# Altium PCB LORA_V1.0.PcbDoc
Units mm, origin at the board's own origin, x right, y up, seen from the top; angles counter-clockwise.
Board outline 52.83 x 35.94 mm, 2 copper layers (Top Layer, Bottom Layer); 20 components, 16 nets, 89 pads, 12 vias.
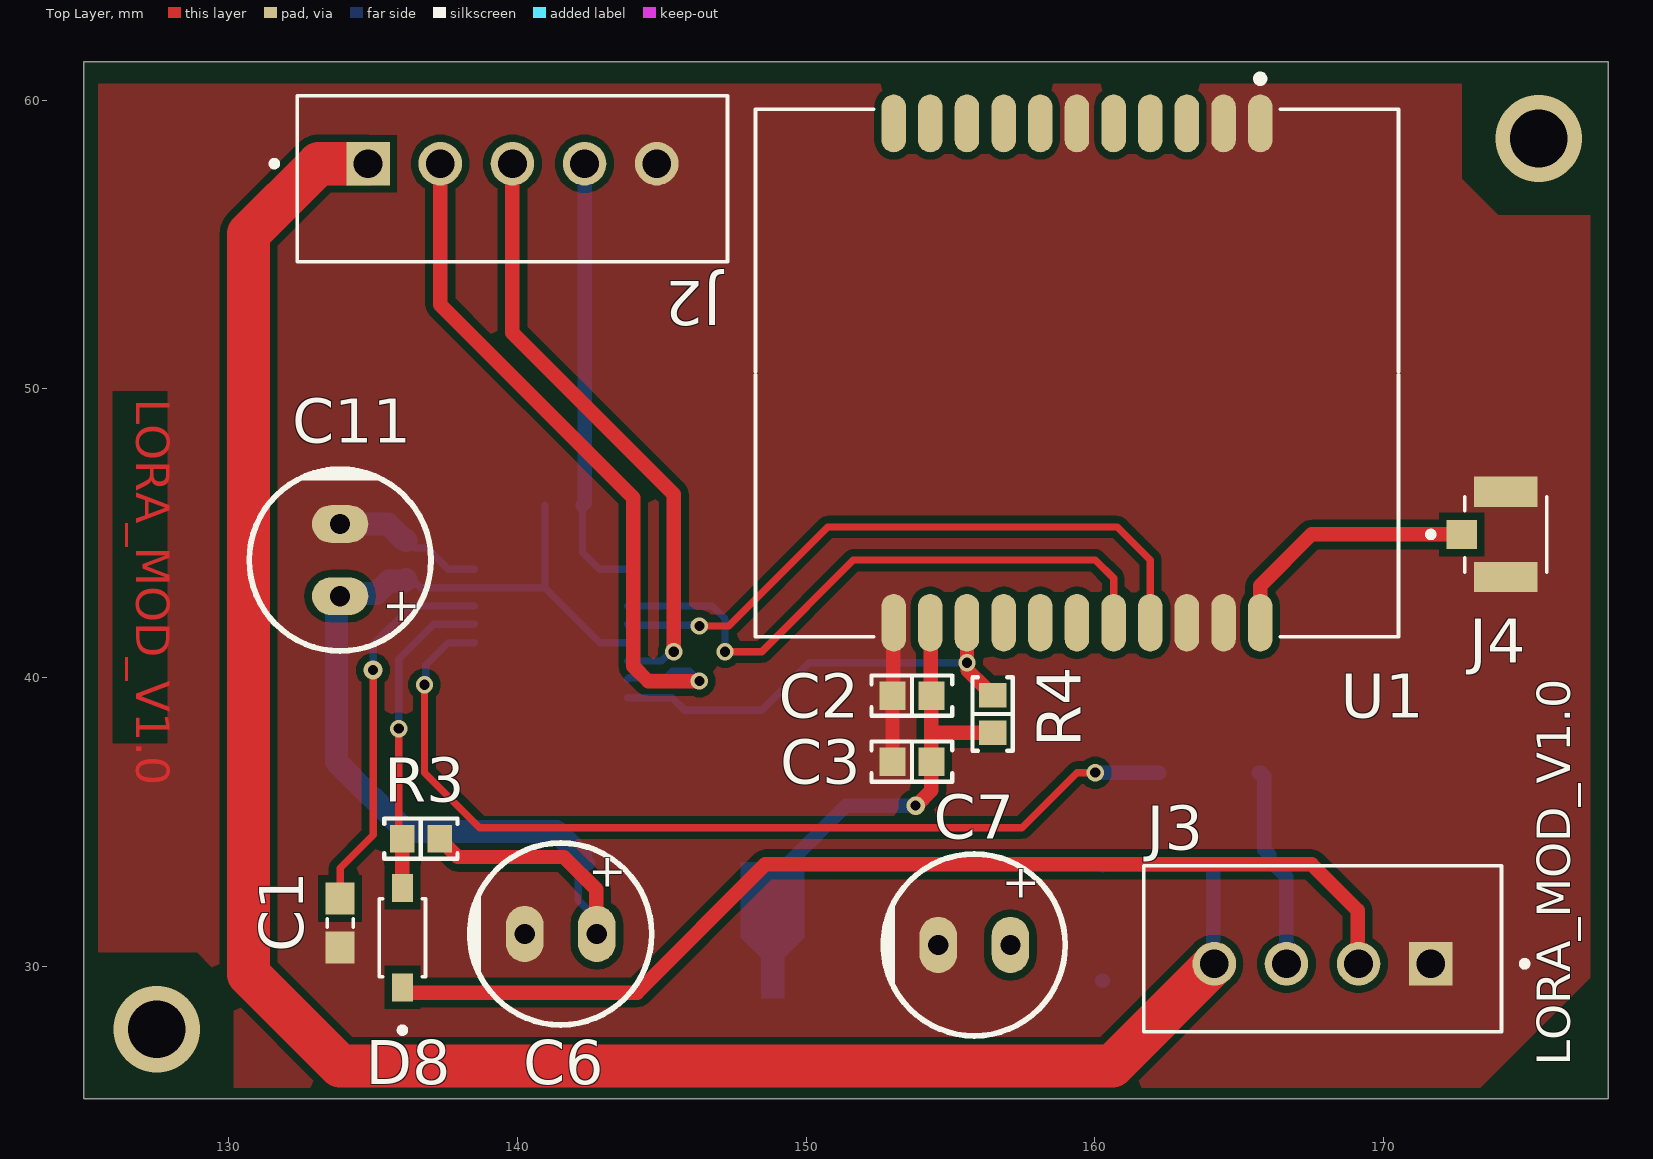
[diagram p0: Top Layer view]
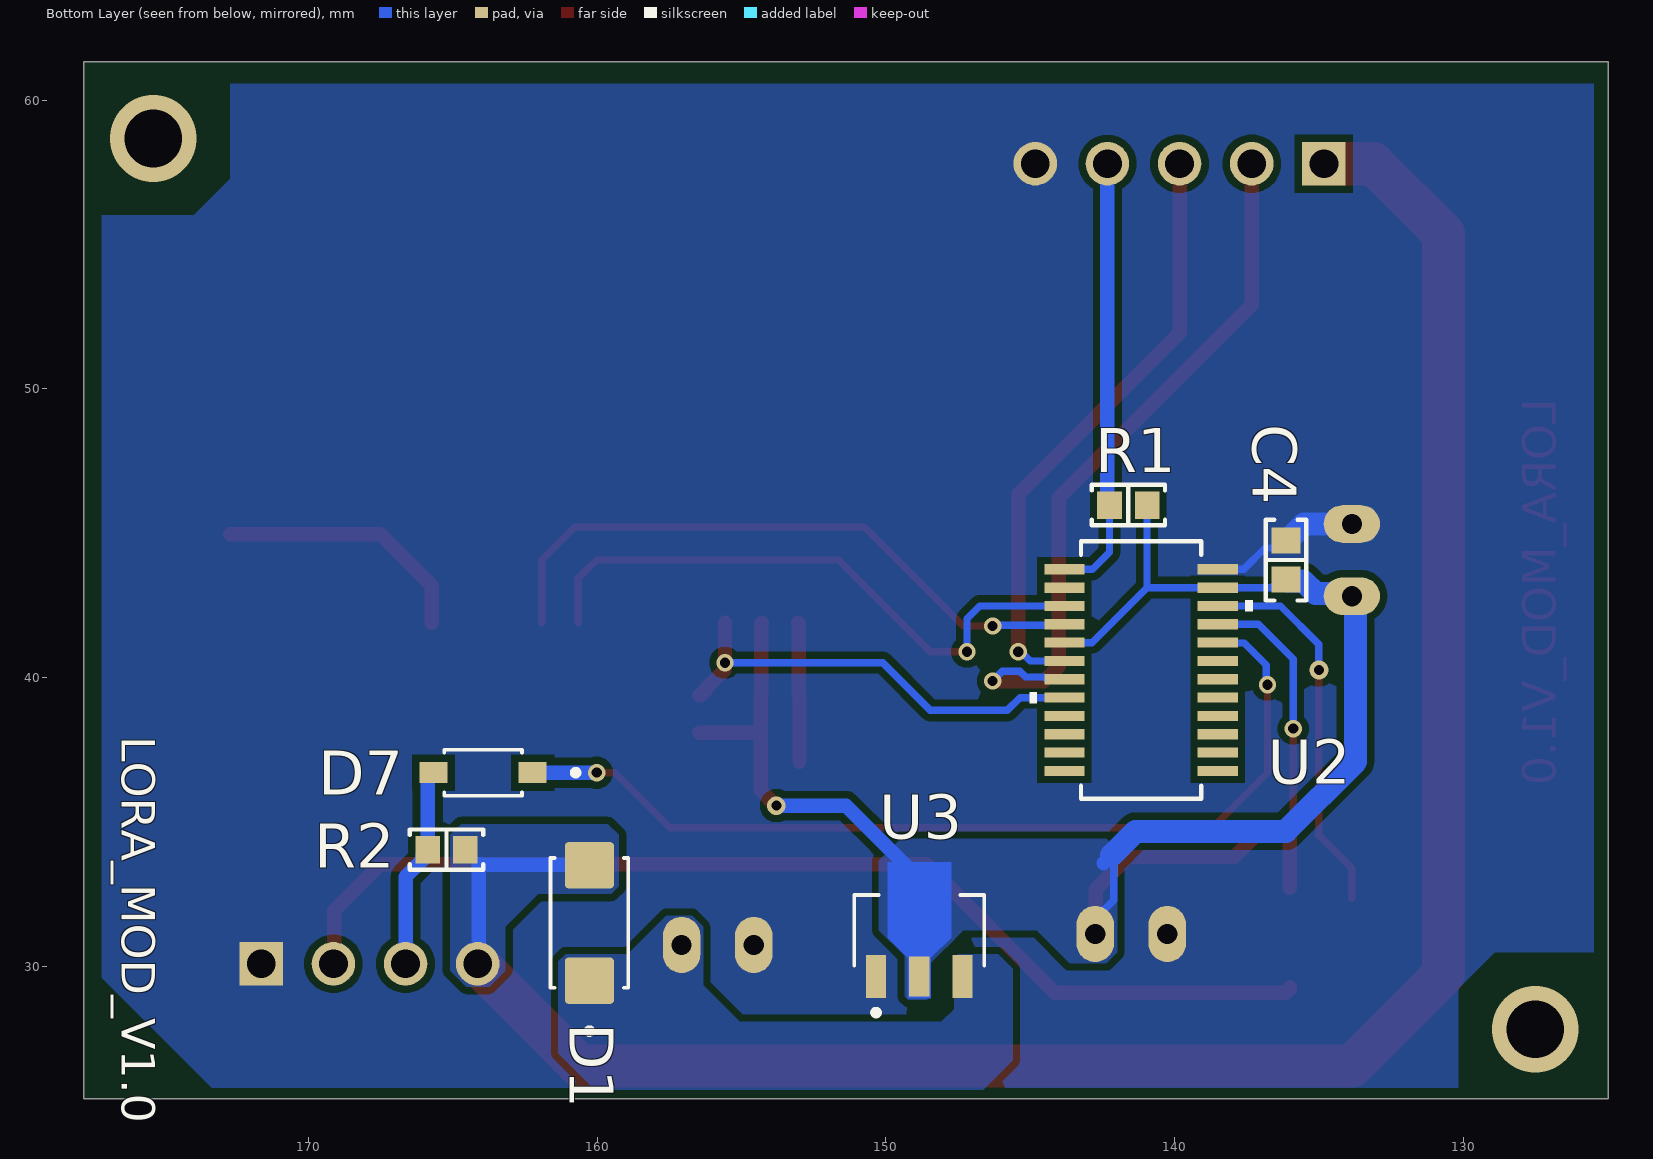
[diagram p1: Bottom Layer view, seen from below]
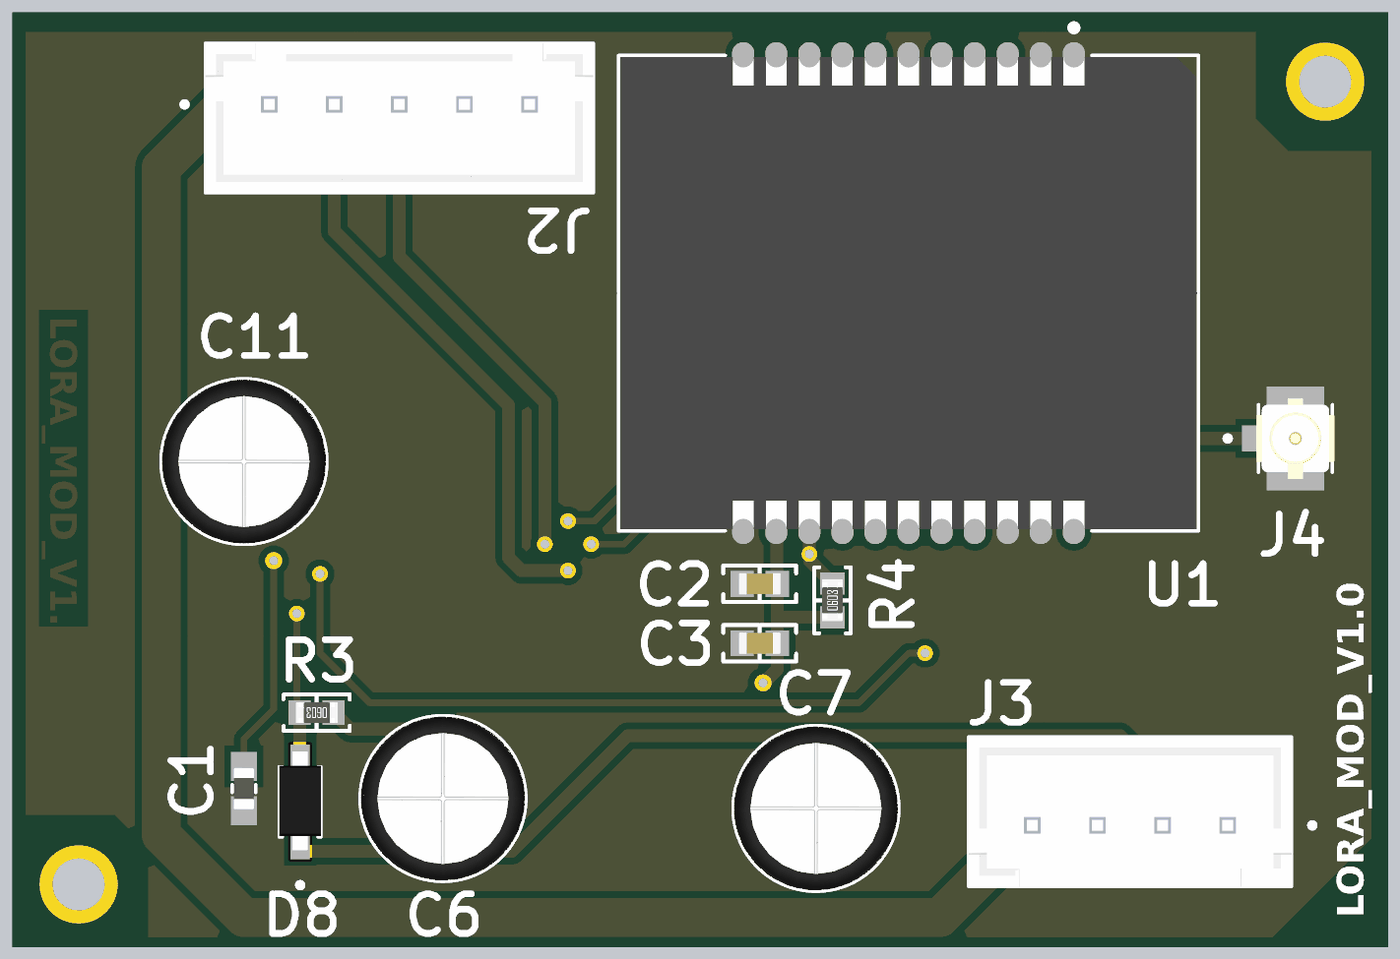
[diagram p2: 3D render of the assembled board from above, using the file's embedded part models]
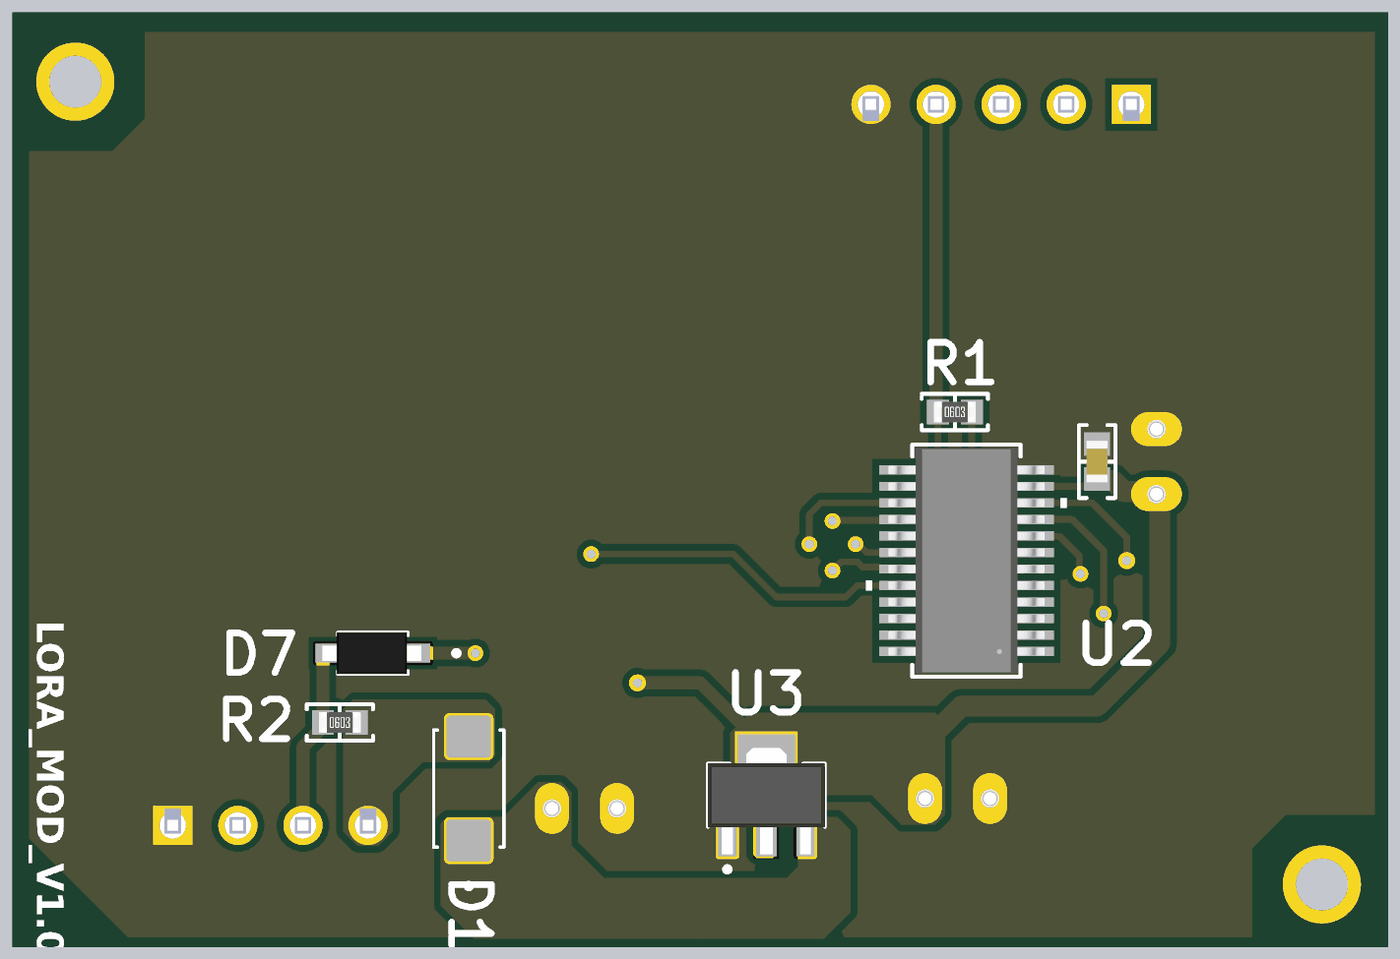
[diagram p3: 3D render of the assembled board from below, using the file's embedded part models]

## Layer stack, top to bottom
Top Solder: solder mask 0.0102, Solder Resist, Dk 3.5
Top Layer: signal copper 0.0356
Dielectric 1: dielectric 0.32, FR-4, Dk 4.8
Bottom Layer: signal copper 0.0356
Bottom Solder: solder mask 0.0102, Solder Resist, Dk 3.5

## Board outline
124.968,25.4 124.968,61.341 177.8,61.341 177.8,25.4

## Design rules (kind name [scope] priority, off if disabled: settings)
Clearance [All] p1: gap=0.254 ignorepadtopadclearanceinfootprint=FALSE
PolygonConnect [All] p1: connectstyle=Direct reliefconductorwidth=0.254 reliefentries=4 polygonreliefangle="90 Angle" airgapwidth=0.254
RoutingVias [All] p1: holewidth=0.35 width=0.65 viastyle="Through Hole" minholewidth=0.35 minwidth=0.6 maxholewidth=0.35 maxwidth=0.6
SolderMaskExpansion [All] p1: expansion=0 istentingtop=FALSE
SupplyNets "Schematic Supply Nets" [InNet('GND')] p1: voltage=0.000
Width [All] p1: maxlimit=1.5 minlimit=0.254 preferedwidth=0.5 bottomlayer_maxwidth=0.8 minimp=50.000000 maximp=50.000000 favimp=50.000000
30 further rules are at their usual default settings.

## Components (designator, comment, footprint, x,y, rotation, side; value= is the part's Value field where it differs from the comment)
C1 "2.2uF" CAPC1608X90 133.858,31.496 r270 top
C2 "0.1uF" "CAP 0603_1608" 153.67,39.37 r0 top value="0.1 µF"
C3 "22uF" "CAP 0603_1608" 153.67,37.084 r0 top value="0.22 µF"
C4 "100nF" "CAP 0603_1608" 136.144,44.069 r270 bottom value="0.1 µF"
C6 "47uF" "CAP TH ALUM ELEC D6.30mm S2.50mm H12.00mm" 141.501,31.115 r0 top value=47µF
C7 "47uF" "CAP TH ALUM ELEC D6.30mm S2.50mm H12.00mm" 155.829,30.734 r0 top value=47µF
C11 "1uF" "CAP TH ALUM ELEC D6.30mm S2.50mm H12.00mm" 133.858,44.069 r270 top
D1 "M7" DIO_M7 160.274,31.496 r90 bottom
D7 "1N4148W" SODFL3816X120N 163.957,36.703 r0 bottom
D8 "1N4148W" SODFL3816X120N 136.017,30.988 r90 top
J2 "B5B-XH-A" JST_B5B-XH-A 139.827,57.277 r180 top
J3 "B4B-XH-A(LF)(SN)" JST_B4B-XH-A(LF)(SN) 167.894,30.607 r0 top
J4 "CONUFL001-SMD" LINX_CONUFL001-SMD 174.244,44.958 r270 top
R1 "10K" "RES 0603_1608" 141.605,45.974 r180 bottom value="10 kOhms"
R2 "2.7K" "RES 0603_1608" 165.227,34.036 r180 bottom value="2.7 kOhms"
R3 "2.7K" "RES 0603_1608" 136.652,34.417 r180 top value="2.7 kOhms"
R4 "10K" "RES 0603_1608" 156.464,38.735 r90 top value="10 kOhms"
U1 "Leirda_WB28" LCCS127P1800X2200X290-22N 159.385,50.546 r270 top
U2 "HT66F0185-24SSOP" SSOP24_150MIL_HLT 141.16,40.257 r0 bottom
U3 "LM1117F-3.3" VREG_LM1117F-3.3 148.844,31.242 r90 bottom

## Footprints (in the part's own frame and the unit in brackets; to place one, negate y for a bottom-side part, rotate by r counter-clockwise, add the part's x,y. Pads: shape width x height; smd on the part's side, far side on the other; paste and mask are expansions set on the pad)
"CAP 0603_1608" [mm] "Chip Capacitor, 2-Leads, Body 1.60x0.80mm, IPC Medium Density"
  rect 0.9x1 smd: 1(-0.675,0) 2(0.675,0)
  silkscreen extent -1.4,-0.7 1.4,0.7, body extent -0.8,-0.41 0.8,0.41, height 0.82
"CAP TH ALUM ELEC D6.30mm S2.50mm H12.00mm" [mm] "6.3mm Diameter 2.5mm Lead Spacing Aluminum Electrolytic Capacitors Radial, Can"
  oval 1.3x1.95 hole 0.7: 1(1.25,0) 2(-1.25,0)
  silkscreen extent -3.15,-3.15 3.15,3.15, body extent -3.16,-3.15 3.15,3.15, height 12
CAPC1608X90 [mm]
  rect 1.1x1 smd: 1(-0.85,0) 2(0.85,0)
  silkscreen extent -0.15,-0.45 0.15,0.45, body extent -0.8,-0.4 0.8,0.4, height 0.9
DIO_M7 [mm]
  rrect15% 1.6x1.7 smd paste+0 mask+0.102: A(2,0) C(-2,0)
  silkscreen extent -3.85,-1.35 2.25,1.35
JST_B4B-XH-A(LF)(SN) [mm]
  rect 1.508x1.508 / inner round 1.508 / far side rect 1.508x1.508 hole 1: 1(3.75,-0.525)
  round 1.508 hole 1: 2(1.25,-0.525) 3(-1.25,-0.525) 4(-3.75,-0.525)
  silkscreen extent -6.2,-2.88 7.1,2.88, body extent -6.2,-2.88 6.2,2.88, height 7
JST_B5B-XH-A [mm]
  rect 1.508x1.508 / inner round 1.508 / far side rect 1.508x1.508 hole 1: 1(5,-0.525)
  round 1.508 hole 1: 2(2.5,-0.525) 3(0,-0.525) 4(-2.5,-0.525) 5(-5,-0.525)
  silkscreen extent -7.45,-2.88 8.35,2.88, body extent -7.45,-2.88 7.45,2.88, height 7
LCCS127P1800X2200X290-22N [mm] "LCC, 22-Pins, Body 18.00x22.00mmx2.90mm, Pitch 1.27mm, IPC Medium Density"
  oval 2x0.85 smd: 1(-8.65,6.35) 2(-8.65,5.08) 3(-8.65,3.81) 4(-8.65,2.54) 5(-8.65,1.27) 6(-8.65,0) 7(-8.65,-1.27) 8(-8.65,-2.54) 9(-8.65,-3.81) 10(-8.65,-5.08) 11(-8.65,-6.35) 12(8.65,-6.35) 13(8.65,-5.08) 14(8.65,-3.81) 15(8.65,-2.54) 16(8.65,-1.27) 17(8.65,0) 18(8.65,1.27) 19(8.65,2.54) 20(8.65,3.81) 21(8.65,5.08) 22(8.65,6.35)
  silkscreen extent -10.32,-11.14 9.14,11.14, body extent -9.08,-11.07 9.08,11.07, height 2.9
LINX_CONUFL001-SMD [mm]
  rect 1x1.05 smd: 1(0,-1.525)
  rect 1.05x2.2 smd: 2(-1.475,0) 3(1.475,0)
  silkscreen extent -1.3,-2.7 1.3,1.42, body extent -1.55,-1.5 1.55,1.5, height 1.3
"RES 0603_1608" [mm] "Chip Resistor, 2-Leads, Body 1.60x0.80mm, IPC Medium Density"
  rect 0.85x0.95 smd: 1(-0.65,0) 2(0.65,0)
  silkscreen extent -1.27,-0.7 1.27,0.7, body extent -0.8,-0.4 0.8,0.4, height 0.45
SODFL3816X120N [mm]
  rect 0.97x0.73 smd paste+0 mask+0.102: A(1.72,0) C(-1.72,0)
  silkscreen extent -3.3,-0.8 1.35,0.8, body extent -1.86,-0.79 1.94,0.81, height 1.1
SSOP24_150MIL_HLT [mil]
  rect 55x14 smd paste+0 mask+0: 1(-104.5,137.5) 2(-104.5,112.5) 3(-104.5,87.5) 4(-104.5,62.5) 5(-104.5,37.5) 6(-104.5,12.5) 7(-104.5,-12.5) 8(-104.5,-37.5) 9(-104.5,-62.5) 10(-104.5,-87.5) 11(-104.5,-112.5) 12(-104.5,-137.5) 13(104.5,-137.5) 14(104.5,-112.5) 15(104.5,-87.5) 16(104.5,-62.5) 17(104.5,-37.5) 18(104.5,-12.5) 19(104.5,12.5) 20(104.5,37.5) 21(104.5,62.5) 22(104.5,87.5) 23(104.5,112.5) 24(104.5,137.5)
  silkscreen extent -152,-176 152,176, body extent -118,-171 118,171, height 69
VREG_LM1117F-3.3 [mm]
  rect 1.5x0.7 smd paste+0 mask+0.102: 1(-1.6,1.5) 3(-1.6,-1.5)
  rect 1.4x0.7 smd paste-2 mask+0: 2(-1.6,0)
  Top Layer region: 2.35,-1.1 -0.25,-1.1 -0.95,-0.4 -2.35,-0.4 -2.35,0.4 -0.95,0.4 -0.25,1.1 2.35,1.1
  silkscreen extent -2.95,-2.25 1.22,2.25, body extent -2.27,-2.25 1.82,2.25, height 1.6

## Part data
C1: library part CC0603KRX7R8BB105, "1 ÂµF Â±10% 25V Ceramic Capacitor X7R 0603 (1608 Metric)", Package="0603 Yageo", Check_prices=https://www.snapeda.com/parts/CC0603KRX7R8BB105/Yageo/view-part/?ref=eda, MF=Yageo, MP=CC0603KRX7R8BB105, SnapEDA_Link=https://www.snapeda.com/parts/CC0603KRX7R8BB105/Yageo/view-part/?ref=snap
C2: library part CS0603KRX7R7BB104, "CAP CER 0.1UF 16V X7R 0603", Capacitance="0.1 µF", Device Package="0603 (1608 Metric)", manufacturer=Yageo, Operating Temperature="-55°C ~ 125°C", Supplier Part Number 1=311-3560-1-ND, Temperature Coefficient=X7R, Tolerance=±10%, Voltage - Rated=16V, Applications="Boardflex Sensitive", componentlink1description=Datasheet, componentlink1url=http://www.yageo.com/NewPortal/yageodocoutput?fileName=/pdf/MLCC/UPY-ST_NPOX7R_16V-to-3KV_5.pdf, componentlink2description="DigiKey Link", componentlink2url=https://www.digikey.com/en/products/detail/yageo/CS0603KRX7R7BB104/6097897, Features="Soft Termination", lastupdated="06-04-2026 19:23:52", Lifecycle Status=Active, Minimum Order=1, Mounting Type="Surface Mount, MLCC", Package / Case="0603 (1608 Metric)", packaging=TapeAndReel, Part Number=CS0603KRX7R7BB104, Part Status=Active, partid=2286, Price=0.02, series=CS, Size / Dimension="0.063\" L x 0.031\" W (1.60mm x 0.80mm)", Supplier 1=DigiKey, Thickness (Max)="0.037\" (0.95mm)"
C3: library part CC0603KRX7R8BB224, "CAP CER 0.22UF 25V X7R 0603", Capacitance="0.22 µF", Device Package="0603 (1608 Metric)", manufacturer=Yageo, Operating Temperature="-55°C ~ 125°C", Supplier Part Number 1=311-1803-1-ND, Temperature Coefficient=X7R, Tolerance=±10%, Voltage - Rated=25V, Applications="General Purpose", componentlink1description=Datasheet, componentlink1url=https://www.yageo.com/upload/media/product/productsearch/datasheet/mlcc/UPY-GPHC_X7R_6.3V-to-50V_18.pdf, componentlink2description="DigiKey Link", componentlink2url=https://www.digikey.com/en/products/detail/yageo/CC0603KRX7R8BB224/5195211, lastupdated="06-04-2026 19:23:53", Lifecycle Status=Active, Minimum Order=1, Mounting Type="Surface Mount, MLCC", Package / Case="0603 (1608 Metric)", packaging=TapeAndReel, Part Number=CC0603KRX7R8BB224, Part Status=Active, partid=2214, Price=0.01, series=CC, Size / Dimension="0.063\" L x 0.031\" W (1.60mm x 0.80mm)", Supplier 1=DigiKey, Thickness (Max)="0.035\" (0.90mm)"
C4: library part CL10E104KC8VPNC, "CAP CER 100NF 100V X8L 0603", Capacitance="100 nF", Device Package="0603 (1608 Metric)", manufacturer="Samsung Electro-Mechanics", Operating Temperature="-55°C ~ 150°C", Ratings=AEC-Q200, Supplier Part Number 1=1276-CL10E104KC8VPNCCT-ND, Temperature Coefficient=X8L, Tolerance=±10%, Voltage - Rated=100V, Applications=Automotive, componentlink1description=Datasheet, componentlink1url=https://mm.digikey.com/Volume0/opasdata/d220001/medias/docus/5458/CL10E104KC8VPNC_Spec.pdf, componentlink2description="DigiKey Link", componentlink2url=https://www.digikey.com/en/products/detail/samsung-electro-mechanics/CL10E104KC8VPNC/20498486, Features="General Purpose", lastupdated="06-04-2026 19:18:46", Lifecycle Status=Active, Minimum Order=1, Mounting Type="Surface Mount, MLCC, Epoxy", Package / Case="0603 (1608 Metric)", packaging=TapeAndReel, Part Number=CL10E104KC8VPNC, partid=68845, Price=0.04, series=CL, Size / Dimension="0.063\" L x 0.031\" W (1.60mm x 0.80mm)", Supplier 1=DigiKey, Thickness (Max)="0.035\" (0.88mm)"
C6 C7: library part UKL1E470KEDANA, "CAP ALUM 47UF 10% 25V RADIAL", Capacitance=47µF, Device Package="Radial, Can", Lifetime @ Temp.="1000 Hrs @ 105°C", manufacturer=Nichicon, Operating Temperature="-40°C ~ 105°C", Ripple Current @ High Frequency="340mA @ 10kHz", Ripple Current @ Low Frequency="170mA @ 120Hz", Supplier Part Number 1=493-15368-ND, Tolerance=±10%, Voltage - Rated=25V, Applications="General Purpose", componentlink1description=Datasheet, componentlink1url=http://nichicon-us.com/english/products/pdfs/e-ukl.pdf, componentlink2description="DigiKey Link", componentlink2url=http://digikey.com/product-detail/en/nichicon/UKL1E470KEDANA/493-15368-ND/2598433, Height - Seated (Max)="0.472\" (12.00mm)", lastupdated="04-09-2020 01:05:44", Lead Spacing="0.098\" (2.50mm)", Lifecycle Status=Active, Minimum Order=1, Mounting Type="Through Hole", Package / Case="Radial, Can", packaging=Bulk, Part Number=UKL1E470KEDANA, Part Status=Active, partid=20077, Polarization=Polar, Price=0.48, series=UKL, Size / Dimension="0.248\" Dia (6.30mm)", Supplier 1=DigiKey
C11: library part UKL1E470KEDANA, "CAP ALUM 47UF 10% 25V RADIAL", Part Number=UKL1E470KEDANA
D1 J4: Package=None, Price=None
  D1: Availability=Unavailable, MF="{'manufacturer': u'Diotec Semiconductor'}", MP=M7
  J4: Availability="In Stock", Check_prices=https://www.snapeda.com/parts/CONUFL001-SMD/Linx/view-part/5842340/?ref=eda, MF=Linx, MP=CONUFL001-SMD, SnapEDA_Link=https://www.snapeda.com/parts/CONUFL001-SMD/Linx/view-part/5842340/?ref=snap
D7 D8: "Small Signal Diode, SOD-123F, 100V, 0.15A, 150Â°C", Package="SOD-123F Diotec", Check_prices=https://www.snapeda.com/parts/1N4148W/Diotec/view-part/?ref=eda, MF="Diotec Semiconductor", MP=1N4148W, SnapEDA_Link=https://www.snapeda.com/parts/1N4148W/Diotec/view-part/?ref=snap
J2: "Connector Header Through Hole 5 position 0.098 (2.50mm)", Package=None, Check_prices=https://www.snapeda.com/parts/B5B-XH-A/JST+Sales+America+Inc./view-part/?ref=eda, MF="JST Sales", MP=B5B-XH-A, SnapEDA_Link=https://www.snapeda.com/parts/B5B-XH-A/JST+Sales+America+Inc./view-part/?ref=snap
J3: "Connector Header Through Hole 4 position 0.098 (2.50mm)", Package=None, Check_prices=https://www.snapeda.com/parts/B4B-XH-A(LF)(SN)/JST+Sales+America+Inc./view-part/?ref=eda, MF="JST Sales", MP=B4B-XH-A(LF)(SN), SnapEDA_Link=https://www.snapeda.com/parts/B4B-XH-A(LF)(SN)/JST+Sales+America+Inc./view-part/?ref=snap
R1 R4: library part CPF0603B10KE, "RES SMD 10K OHM 0.1% 1/16W 0603", Device Package="0603 (1608 Metric)", manufacturer="TE Connectivity Passive Product", Operating Temperature="-55°C ~ 155°C", Power (Watts)="0.063W, 1/16W", Resistance="10 kOhms", Supplier Device Package=0603, Supplier Part Number 1=A119886CT-ND, Temperature Coefficient=±25ppm/°C, Tolerance=±0.1%, componentlink1description=Datasheet, componentlink1url=https://www.te.com/commerce/DocumentDelivery/DDEController?Action=srchrtrv&DocNm=1773200&DocType=DS&DocLang=English, componentlink2description="DigiKey Link", componentlink2url=https://www.digikey.com/en/products/detail/te-connectivity-passive-product/CPF0603B10KE/2389826, Composition="Thin Film", Height - Seated (Max)="0.022\" (0.55mm)", lastupdated="09-02-2024 20:43:37", Lifecycle Status=Active, Minimum Order=1, Number of Terminations=2, Package / Case="0603 (1608 Metric)", packaging=TapeAndReel, Part Number=CPF0603B10KE, Part Status=Active, partid=4872, Price=0.09, series="CPF, Neohm", Size / Dimension="0.061\" L x 0.031\" W (1.55mm x 0.80mm)", Supplier 1=DigiKey
R2 R3: library part ERA-3AEB272V, "RES SMD 2.7K OHM 0.1% 1/10W 0603", Device Package="0603 (1608 Metric)", manufacturer="Panasonic Electronic Components", Operating Temperature="-55°C ~ 155°C", Power (Watts)="0.1W, 1/10W", Ratings=AEC-Q200, Resistance="2.7 kOhms", Supplier Device Package=0603, Supplier Part Number 1=P2.7KDBCT-ND, Temperature Coefficient=±25ppm/°C, Tolerance=±0.1%, componentlink1description=Datasheet, componentlink1url=https://industrial.panasonic.com/cdbs/www-data/pdf/RDM0000/AOA0000C307.pdf, componentlink2description="DigiKey Link", componentlink2url=https://www.digikey.com/en/products/detail/panasonic-electronic-components/ERA-3AEB272V/1465864, Composition="Thin Film", Features="Automotive AEC-Q200", Height - Seated (Max)="0.022\" (0.55mm)", lastupdated="09-02-2024 20:43:34", Lifecycle Status=Active, Minimum Order=1, Number of Terminations=2, Package / Case="0603 (1608 Metric)", packaging=TapeAndReel, Part Number=ERA-3AEB272V, Part Status=Active, partid=5556, Price=0.03, series=ERA-3A, Size / Dimension="0.063\" L x 0.031\" W (1.60mm x 0.80mm)", Supplier 1=DigiKey
U2: "Description", Manufacturer_Name=Holtek, Copyright="Copyright (C) 2025 Ultra Librarian. All rights reserved.", Manufacturer_Part_Number=HT66F0185-24SSOP, RefDes=RefDes, Type=Type
U3: "1.0A LDO Fixed & Adjustable Voltage Regulator", Package=Package, Check_prices=https://www.snapeda.com/parts/LM1117F-3.3/TAEJIN/view-part/?ref=eda, MF=TAEJIN, MP=LM1117F-3.3, SnapEDA_Link=https://www.snapeda.com/parts/LM1117F-3.3/TAEJIN/view-part/?ref=snap

## Via types
v1: diameter 0.6, hole 0.35, Top Layer to Bottom Layer, 8 vias
v2: diameter 0.65, hole 0.35, Top Layer to Bottom Layer, 2 vias
v3: diameter 3, hole 2, Top Layer to Bottom Layer, 2 vias

## Nets (pads, with @x,y where several pads share a name; then routed paths per layer and width w, separated by ;. In a path a pad name is that pad's centre, name@x,y a point inside that pad or via, vN(x,y) a via of type N, cw(c..) or ccw(c..) an arc to the next point about the centre after c; other vN are vias at no path point)
+3V3: C2.2 C3.2 C4.2 C6.1 C11.1 R1.2 R3.1 R4.1 U1.13 U2.11 U2.17 U3.2 | length 58.9
  Top Layer w0.5: R3.1 137.937,33.782 141.605,33.782 142.728,32.659 C6.1@142.728,31.115 ; v2(153.797,35.56) 153.812,35.56 154.345,36.093 C3.2 154.345,38.227 ; U1.13 154.325,41.876 154.325,39.39 C2.2 154.345,38.227 ; R4.1 154.487,38.085 154.345,38.227
  Bottom Layer w0.254: C4.2@136.271,43.487 136.644,43.114 U2.11 140.955,43.114 ; R1.2 140.955,43.114 ; 142.113,33.782 142.113,32.283 142.728,31.668 C6.1@142.728,31.115 ; U2.17 142.86,41.209 140.955,43.114
  Bottom Layer w0.5: 142.177,33.846 142.462,33.56 ; U3.2 148.844,33.02 151.384,35.56 v2(153.797,35.56)
  Bottom Layer w0.8: C11.1@133.529,42.915 135.117,42.915 135.546,43.344 136.094,43.344 C4.2 ; C11.1@133.731,42.819 133.731,37.084 136.144,34.671 141.351,34.671 142.177,33.846
+5V: D1.A J2.1 J3.4 R2.2 | length 74.3
  Top Layer w1.5: J2.1 133.113,57.802 130.683,55.372 130.683,29.718 133.858,26.543 160.605,26.543 J3.4
  Bottom Layer w0.5: D1.A 160.29,33.512 164.053,33.512 164.069,33.528 164.106,33.491 164.106,30.12 J3.4
COMMU_RXD: U1.19 U2.16 | length 22.2
  Top Layer w0.254: v1(146.304,41.783) 147.32,41.783 150.749,45.212 160.782,45.212 161.925,44.069 U1.19
  Bottom Layer w0.254: U2.16 143.845,41.814 146.273,41.814 v1(146.304,41.783)
COMMU_TXD: U1.18 U2.15 | length 21.3
  Top Layer w0.254: v1(147.193,40.894) 148.463,40.894 151.638,44.069 160.02,44.069 160.655,43.434 U1.18
  Bottom Layer w0.254: U2.15 146.751,42.479 147.193,42.037 v1(147.193,40.894)
GND: C1.2 C2.1 C3.1 C4.1 C6.2 C7.2 C11.2 J2.5 J3.1 J4.2 J4.3 U1.1 U1.2 U1.6 U1.12 U1.20 U1.21 U2.12 U3.1 | length 10.1
  Top Layer w0.5: C3.1 C2.1 153.015,39.39 153.015,41.876 U1.12
  Bottom Layer w0.254: C4.1 136.4,44.488 136.868,44.488 137.603,43.753 138.503,43.753 U2.12
  Bottom Layer w0.8: C11.2 135.519,45.319 136.044,44.794 136.094,44.794 C4.1
NetC1_1: C1.1 U2.10 | length 13.3
  Top Layer w0.254: C1.1 133.858,33.401 135.001,34.544 v2(135.001,40.259)
  Bottom Layer w0.254: v2(135.001,40.259) 135.001,41.148 136.332,42.479 U2.10
NetJ4_1: J4.1 U1.22 | length 9
  Top Layer w0.5: U1.22 165.735,43.18 167.513,44.958 J4.1
NRESET: J2.4 R1.1 U2.13 | length 15.3
  Bottom Layer w0.254: R1.1 142.255,44.338 142.844,43.749 U2.13
  Bottom Layer w0.5: R1.1 142.327,46.046 J2.4
RESET: R4.2 U1.14 U2.20 | length 15.5
  Top Layer w0.5: U1.14 v1(155.575,40.513) 155.594,40.494 155.594,40.255 156.239,39.61 156.239,39.56 156.414,39.385 R4.2
  Bottom Layer w0.254: U2.20 145.354,39.304 145.796,38.862 148.463,38.862 150.114,40.513 v1(155.575,40.513)
RXD: D7.A J3.3 R2.1 | length 7.1
  Bottom Layer w0.5: D7.A 165.762,36.703 165.877,36.588 R2.1 166.052,33.861 166.052,33.685 166.644,33.093 J3.3
RXD_MCU: D8.A R3.2 U2.9 | length 11.2
  Top Layer w0.254: v1(135.89,38.227) 135.89,34.417 R3.2@136.013,34.294
  Top Layer w0.5: D8.A@136.006,32.719 R3.2@136.006,34.413
  Bottom Layer w0.254: v1(135.89,38.227) 135.89,40.64 137.094,41.844 U2.9
SWCLK: J2.3 U2.18 | length 21
  Top Layer w0.5: J2.3 139.827,51.943 145.415,46.355 v1(145.415,40.894)
  Bottom Layer w0.254: U2.18 145.002,40.574 145.321,40.894 v1(145.415,40.894)
SWDIO: J2.2 U2.19 | length 25.4
  Top Layer w0.5: J2.2 137.327,52.919 144.018,46.228 144.018,40.386 144.526,39.878 v1(146.304,39.878)
  Bottom Layer w0.254: U2.19 143.865,39.99 144.509,39.99 144.535,40.016 145.161,40.016 145.359,40.213 145.969,40.213 v1(146.304,39.878)
TXD: D8.C J3.2 | length 37.6
  Top Layer w0.5: D8.C 136.017,29.198 136.132,29.083 144.145,29.083 148.59,33.528 167.513,33.528 169.107,31.934 169.107,30.119 J3.2
TXD_MCU: D7.C U2.8 | length 32.8
  Top Layer w0.254: v1(136.779,39.751) 136.779,36.703 138.684,34.798 157.48,34.798 159.385,36.703 v1(160.02,36.703)
  Bottom Layer w0.254: v1(136.779,39.751) 136.825,39.797 136.825,40.432 137.588,41.195 138.492,41.195 U2.8
  Bottom Layer w0.5: v1(160.02,36.703) D7.C
VIN: C7.1 D1.C U3.3 | length 0
  Bottom Layer w0.5: D1.C@160.268,29.49 D1.C
pads on no net: U1.3 U1.4 U1.5 U1.7 U1.8 U1.9 U1.10 U1.11 U1.15 U1.16 U1.17 U2.1 U2.2 U2.3 U2.4 U2.5 U2.6 U2.7 U2.14 U2.21 U2.22 U2.23 U2.24
copper on no net:
  other v3: 127.508,27.813 175.387,58.674

## Polygon pours and split planes (outlines as drawn)
GND on Bottom Layer "MAIN_GND" (solid, pour order 6): 125.476,60.579 172.72,60.579 172.72,57.277 173.99,56.007 177.165,56.007 177.165,29.591 173.355,25.781 130.175,25.781 130.175,29.21 128.905,30.48 125.476,30.48
+5V on Bottom Layer "+5V_L02_P000" (solid, pour order 0): 164.549,29.294 165.1,29.845 165.1,34.544 164.719,34.925 159.639,34.925 159.258,34.544 159.258,32.766 159.512,32.512 162.052,32.512 163.195,31.369 163.195,29.845 163.746,29.294
+3V3 on Bottom Layer "+3V3_L02_P005" (solid, pour order 5): 148.463,28.956 148.463,30.099 147.32,31.242 144.78,31.242 143.637,30.099 142.367,30.099 141.986,30.48 141.986,34.036 142.367,34.417 149.479,34.417 150.241,33.655 150.241,31.242 149.352,30.353 149.352,28.956 149.225,28.829 148.59,28.829
GND on Bottom Layer "GND_L02_P004" (solid, pour order 4): 154.051,28.829 155.321,30.099 155.321,31.877 154.813,32.385 153.162,32.385 151.257,30.48 150.114,30.48 149.987,30.353 149.987,28.829
VIN on Bottom Layer "VIN_L02_P001" (solid, pour order 1): 156.337,29.337 156.337,31.369 156.718,31.75 157.607,31.75 158.94,30.416 161.099,30.417 161.353,30.163 161.353,26.988 160.083,25.718 146.621,25.718 145.605,26.734 145.605,29.909 146.113,30.417 147.51,30.417 147.637,30.29 147.637,28.512 148.082,28.067 155.067,28.067
GND on Top Layer "MAIN_GND_TOP" (solid, pour order 8): 125.476,60.579 172.72,60.579 172.72,57.277 173.99,56.007 177.165,56.007 177.165,29.591 173.355,25.781 130.175,25.781 130.175,29.21 128.905,30.48 125.476,30.48

## Other copper
Top Layer:
  text "LORA_MOD_V1.0" at 126.421,49.655 h2 r270
Bottom Layer:

## Silkscreen, mask and mechanical layers (free items; w line width, h text height)
Top Overlay:
  text "LORA_MOD_V1.0" at 176.855,26.545 h2 r90
Bottom Overlay:
  text "LORA_MOD_V1.0" at 176.855,37.971 h2 r90
Mechanical 1:
  the board outline again, w0.254

## Text inside footprints (layer, text, board x,y; h text height)
C6: Top Overlay "+" at 142.451,32.365 h2
C7: Top Overlay "+" at 156.779,31.984 h2
C11: Top Overlay "+" at 135.108,43.119 h2 r270
U2: Mechanical 13 "*" at 139.268,37.272 h1.27 r180